# Altium PCB ffultra_pcb.PcbDoc (part 3 of 3)
Units mm, origin at the board's own origin, x right, y up, seen from the top; angles counter-clockwise.
Board outline 28 x 55 mm, 6 copper layers (Top, GND-T, Inner, Power, GND-B, Bottom), stack 1.538 mm thick; 121 components, 88 nets, 471 pads, 349 vias.
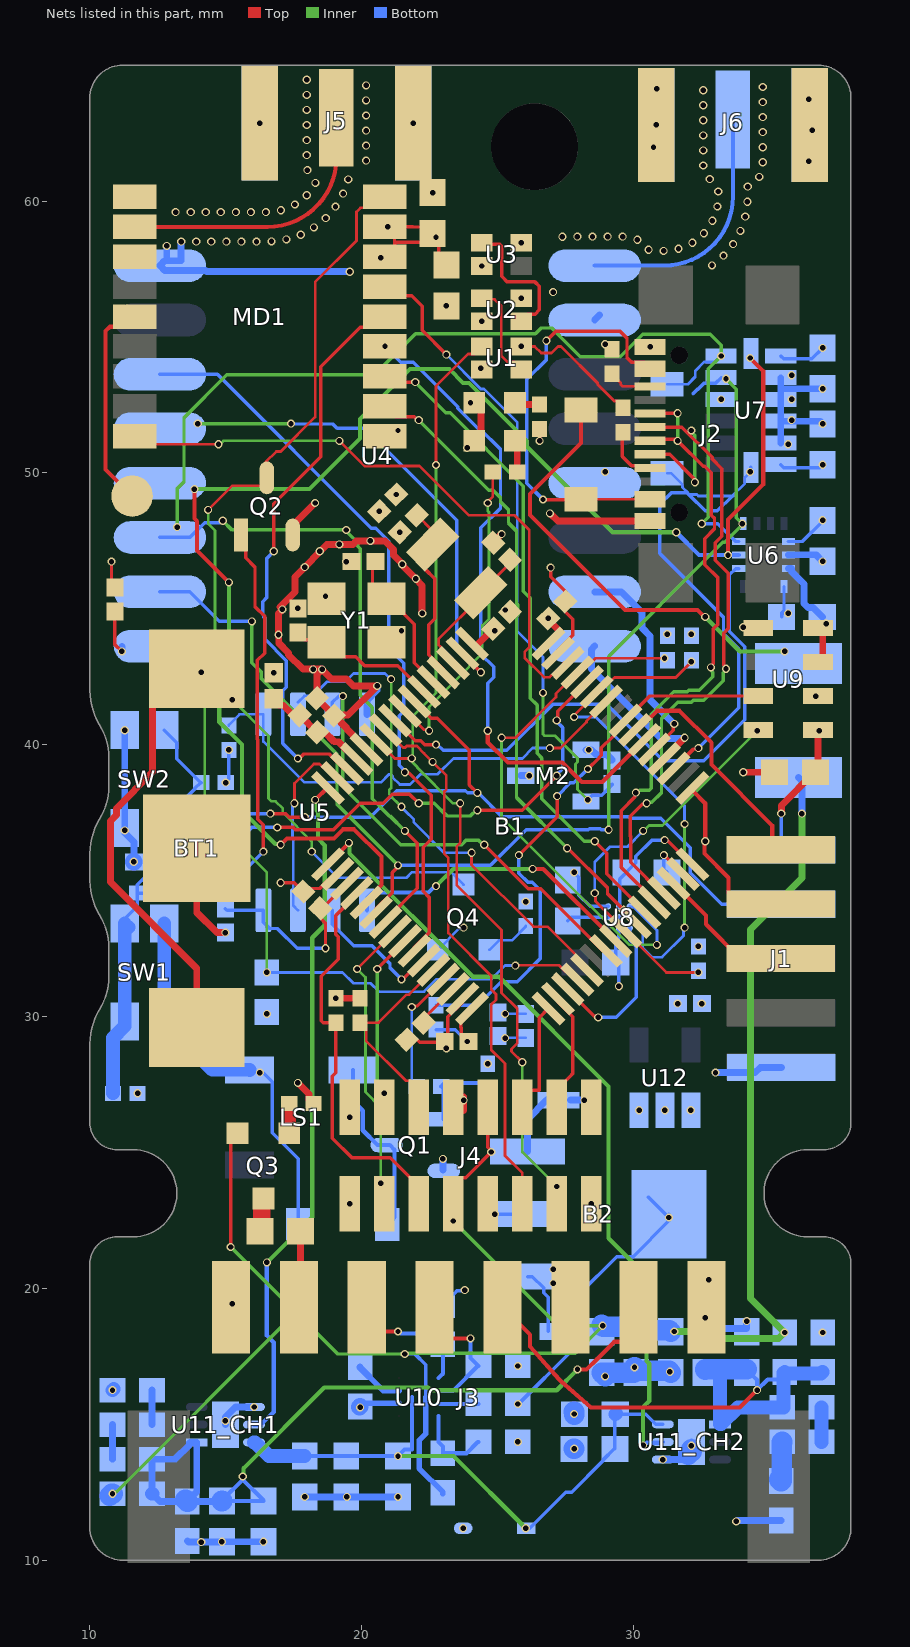
[diagram p6: the nets of this part, all layers, seen from the top]

## Via types
v1: diameter 0.3, hole 0.2, Top to Bottom, tented both sides, 349 vias

## Nets (pads, with @x,y where several pads share a name; then routed paths per layer and width w, separated by ;. In a path a pad name is that pad's centre, name@x,y a point inside that pad or via, vN(x,y) a via of type N, cw(c..) or ccw(c..) an arc to the next point about the centre after c; other vN are vias at no path point) (continued)
3V3: B1.1 B1.19 B1.32 B1.48 B1.64 B2.2 B2.4 C9.2 C10.2 C11.2 C12.2 C13.2 C14.2 C15.2 C16.2 C17.2 C18.2 C19.2 C21.2 C22.2 C23.2 C25.2 C27.2 C28.2 C29.2 C39.1 D1.2 FB1.2 J1.10 J4.7 J4.10 LS1.1 M2.3 MD1.7 MD1.8 Q4.2 R1.2 R5.2 R10.1 R12.2 R14.2 R15.2 R16.2 R17.2 R18.2 R19.2 R24.2 SW1.1 SW1.1' U1.2 U2.2 U3.2 U4.13 U5.8 U6.5 U6.8 U7.1 U7.6 U8.B3 U9.1 U9.2 U12.1 U12.3 | length 67.9
  Top w0.1: v1(10.795,46.736) 10.795,45.906 C39.1@10.922,45.779 C39.1@11.108,45.593
  Top w0.127: v1(18.669,32.512) 18.669,33.433 18.472,33.63 C14.2@18.472,33.979 18.546,33.979 B1.19@19.465,34.898 ; v1(20.701,57.912) 20.815,57.912 MD1.7@20.856,57.953 21.206,58.303 21.206,58.417 ; MD1.8@20.856,59.053 MD1.8@21.206,59.053 ; C15.2@23.114,57.646 22.829,57.93 22.829,58.59 C16.2@22.606,58.813 C16.2@22.543,58.75 ; C10.2@23.935,29.083 23.915,29.083 23.668,29.329 23.668,29.583 23.645,29.607 23.645,29.886 B1.32@24.061,30.301 ; v1(26.543,51.181) R14.2@26.543,51.62 ; v1(31.144,36.494) 31.178,36.461 31.256,36.461 32.112,35.605 B1.48@32.176,35.605 ; U9.1@36.691,40.447 U9.1@36.787,40.543 ; 21.206,58.417 MD1.8@21.206,59.053 ; 21.206,58.417 21.28,58.491 22.284,58.491 C16.2@22.543,58.75 ; MD1.8@21.206,59.053 21.883,59.053 21.888,59.048 22.244,59.048 C16.2@22.543,58.75
  Top w0.254: v1(19.05,30.676) R5.2@19.939,30.676 ; 23.749,26.543 v1(23.749,26.924) v1@23.749,27.051 ; B1.1@24.061,43.719 24.158,43.622 24.191,43.622 C13.2@24.835,44.266 ; C9.2@26.714,44.647 v1(26.867,44.647) ; C9.2@26.808,44.647 27.288,44.167 27.288,44.135 B1.64@26.872,43.719 B1.64@26.872,43.752 ; v1(35.433,37.465) 35.442,37.474 35.442,37.765 36.666,38.989 C29.2@36.691,38.989 36.787,39.085 U9.1@36.787,40.543
  Bottom w0.1: Q4.2@22.799,32.455 23.58,33.236 23.711,33.236 v1(23.749,33.274) ; v1(25.273,29.21) 25.273,29.213 25.279,29.219 C11.2@26.035,29.219
  Bottom w0.127: C21.2@14.986,33.968 15.045,33.909 U5.8@16.383,33.909 16.383,33.466 16.609,33.24 16.897,33.24 17.625,32.512 v1(18.669,32.512) ; v1(14.997,38.608) 15.113,38.724 v1(15.113,39.809) ; v1(16.256,27.94) 16.379,27.94 16.717,27.602 16.717,25.725 17.666,24.776 D1.2@17.666,22.352 ; R17.2@22.733,29.522 23.437,29.522 v1(23.876,29.083) ; v1(24.892,22.733) B2.2@26.102,22.733 ; v1(25.744,15.748) 25.769,15.748 27.745,17.724 C19.2@27.745,18.415 27.765,18.415 28.012,18.661 28.012,19.804 29.379,21.171 29.99,21.171 31.302,22.483 v1(31.302,22.608) ; U8.B3@29.464,34.055 29.483,34.074 29.483,34.146 29.486,34.149 29.486,35.062 30.081,35.657 30.081,35.897 30.678,36.494 v1(31.144,36.494) ; B2.4@30.549,23.361 v1(31.302,22.608) ; B2.4@31.302,22.733 v1(31.302,22.608) ; U7.6@35.418,50.303 35.524,50.197 36.85,50.197 v1(36.957,50.304) ; U7.1@35.418,54.303 35.524,54.197 36.556,54.197 v1(36.957,54.598) ; v1(35.433,37.465) 35.433,36.135 J1.10@35.437,36.131 ; C23.2@35.445,44.704 C23.2@35.445,44.843 ; U6.8@35.536,45.822 35.536,44.934 C23.2@35.445,44.843 ; v1(35.687,44.831) 35.675,44.843 C23.2@35.445,44.843 ; U6.5@35.7,47.477 36.211,47.477 36.957,48.223 C22.2@36.957,48.248
  Bottom w0.254: M2.3@25.851,38.862 v1(26.162,38.862)
  Bottom w0.508: SW1.1'@12.734,33.423 SW1.1@12.734,29.823 12.734,29.648 13.005,29.377 13.18,29.377 14.516,28.041 15.878,28.041 LS1.1@15.88,28.039
  other v1: 30.206,26.556 32.106,26.556 16.51,30.099 32.512,30.48 32.385,32.581 36.83,40.513 36.703,41.783 16.764,42.643 31.242,44.069 32.131,44.069 24.892,44.196 36.957,48.26 21.266,49.206 28.956,50.038 24.384,53.848 24.421,55.582 24.421,57.614 22.733,58.674 20.955,59.055
BAT+: J3.2 RT1.1 | length 2.8
  Top w0.254: J3.2@17.686,19.304 17.746,19.364 RT1.1@17.746,22.098
BOOT0: B1.60 R2.2 R7.2 SW1.2 SW1.2' | length 30.7
  Top w0.127: v1(16.891,36.957) 17.476,36.957 17.562,36.871 18.964,36.871 19.939,37.846 20.788,37.846 21.128,38.186 21.758,38.186 v1(22.098,37.846) ; v1(24.257,37.592) 24.304,37.592 25.908,37.592 v1(27.178,38.862) ; v1(27.178,40.894) 27.211,40.927 27.211,41.23 B1.60@28.287,42.305
  Inner w0.127: v1(22.098,37.846) 22.67,37.846 23.137,37.379 23.997,37.379 24.21,37.592 v1(24.257,37.592)
  Bottom w0.127: SW1.2'@11.284,33.423 11.284,33.598 11.746,34.06 R7.2@11.746,34.544 ; R7.2@12.003,34.544 R7.2@11.746,34.544 ; v1(16.891,36.957) 15.946,36.957 14.103,35.114 12.01,35.114 11.746,34.849 R7.2@11.746,34.544 ; v1(27.178,38.862) 27.178,38.909 27.391,39.122 27.391,40.634 27.178,40.847 v1(27.178,40.894)
  Bottom w0.508: R2.2@10.853,27.178 10.853,29.217 11.284,29.648 SW1.2'@11.284,32.852 ; SW1.2'@11.284,33.423 SW1.2'@11.284,32.852 ; SW1.2'@11.429,33.287 11.284,33.142 SW1.2'@11.284,32.852
BUZZ: B1.29 R3.1 | length 4.6
  Top w0.1: v1(21.844,30.353) 21.882,30.391 22.044,30.391 23,31.348 B1.29@23,31.362
  Bottom w0.1: v1(21.844,30.353) 21.844,27.617 R3.1@22.029,27.432
CONT1: R35_CH1.1 R37_CH1.2 | length 1.3
  Bottom w0.254: R35_CH1.1@10.832,13.716 R37_CH1.2@10.832,14.986
CONT2: R35_CH2.1 R37_CH2.2 | length 1.3
  Bottom w0.508: R37_CH2.2@36.92,14.351 R35_CH2.1@36.92,15.621
DEBUG_LED: B1.8 R6.2 | length 11.7
  Top w0.1: B1.8@21.586,41.245 21.603,41.245 22.297,40.551 22.441,40.551 v1(22.479,40.513) ; v1(24.638,48.895) 24.638,48.949 24.823,49.134 R6.2@24.823,50.038
  Inner w0.1: v1(22.479,40.513) 22.479,41.346 22.479,41.387 23.14,42.048 23.413,42.321 23.431,42.339 23.449,42.365 24.438,43.377 24.438,44.384 24.68,44.626 24.68,48.557 24.642,48.595 24.642,48.891 v1(24.638,48.895)
EN_CH1: B1.16 U11_CH1.5 | length 25.2
  Top w0.154: v1(18.288,37.973) 18.731,38.416 B1.16@18.758,38.416
  Inner w0.154: v1(16.51,20.955) 18.182,22.627 18.182,32.901 18.642,33.361 18.642,36.296 18.388,36.55 18.388,37.537 18.316,37.61 18.316,37.945 v1(18.288,37.973)
  Bottom w0.154: U11_CH1.5@16.039,14.986 16.296,14.986 16.764,15.454 16.764,18.013 16.51,18.267 v1(16.51,20.955)
EN_CH2: B1.17 U11_CH2.5 | length 29.3
  Top w0.154: B1.17@18.758,35.605 18.758,35.619 v1(19.526,36.388)
  Inner w0.154: v1(19.526,36.388) 19.548,36.366 19.548,36.006 24.088,31.466 25.049,31.466 29.083,27.432 29.083,21.844 30.48,20.447 30.48,17.329 30.58,17.229 30.58,15.86 30.353,15.633 v1(30.353,14.224)
  Bottom w0.154: v1(30.353,14.224) 30.392,14.224 30.493,14.325 31.052,14.325 U11_CH2.5@31.078,14.351
"Flash CLK": B1.27 U5.6 | length 5.1
  Top w0.127: v1(21.463,31.369) 21.51,31.369 22.21,32.069 B1.27@22.293,32.069
  Bottom w0.127: U5.6@18.923,33.909 18.923,33.394 19.712,32.605 20.38,32.605 21.041,31.944 21.041,31.791 v1(21.463,31.369)
"Flash IO 0": B1.40 U5.5 | length 11.1
  Top w0.154: v1(26.289,35.433) 26.68,35.433 29.337,32.776 B1.40@29.347,32.776
  Inner w0.154: v1(22.733,34.798) 23.368,35.433 v1(26.289,35.433)
  Bottom w0.154: U5.5@20.193,33.909 20.193,34.352 20.406,34.564 22.46,34.564 22.694,34.798 v1(22.733,34.798)
"Flash IO 1": B1.37 U5.2 | length 18.6
  Top w0.1: v1(24.042,36.027) 24.042,35.583 26.316,33.309 26.835,33.309 28.287,31.857 B1.37@28.287,31.716
  Inner w0.1: v1(21.082,42.418) 21.082,38.408 21.011,38.338 21.011,38.171 v1(21.463,37.719)
  Bottom w0.1: U5.2@17.653,41.563 17.891,41.801 18.199,41.801 18.717,42.319 19.407,42.319 19.706,42.618 20.858,42.618 21.058,42.418 v1(21.082,42.418) ; v1(21.463,37.719) 21.463,37.697 21.622,37.538 21.917,37.243 21.917,37.145 23.035,36.027 v1(24.042,36.027)
"Flash IO 2": B1.39 U5.3 | length 16.6
  Top w0.127: v1(24.511,36.322) 26.134,34.699 26.595,34.699 28.871,32.423 B1.39@28.994,32.423
  Inner w0.127: v1(19.309,41.788) 19.309,38.45 21.437,36.322 23.675,36.322 23.848,36.495 24.291,36.495 24.464,36.322 v1(24.511,36.322)
  Bottom w0.127: U5.3@18.923,41.119 18.923,41.562 19.149,41.788 v1(19.309,41.788)
"Flash IO 3": B1.15 U5.7 | length 6.8
  Top w0.1: v1(17.526,37.846) 17.526,38.581 18.239,39.294 18.446,39.294 18.554,39.185 B1.15@19.111,38.77
  Bottom w0.1: v1(17.526,37.846) 17.526,37.792 17.453,37.719 17.453,36.529 17.485,36.497 17.485,34.077 U5.7@17.653,33.909
"Flash NCS": B1.58 R15.1 U5.1 | length 17.3
  Top w0.1: v1(26.924,39.878) 27.312,39.878 28.267,40.833 28.267,40.871 B1.58@28.994,41.598
  Bottom w0.1: R15.1@15.113,40.709 15.113,40.734 15.498,41.119 U5.1@16.383,41.119 16.383,40.122 17.888,38.617 20.703,38.617 20.995,38.909 21.077,38.909 21.136,38.85 21.136,38.801 21.402,38.535 21.778,38.535 22.159,38.916 22.794,38.916 23.375,39.497 25.908,39.497 26.289,39.878 v1(26.924,39.878)
GND: B1.12 B1.18 B1.31 B1.47 B1.63 B2.1 BT1.1 C1.1 C2.1 C3.1 C4.1 C5.1 C6.1 C7.1 C8.1 C9.1 C10.1 C11.1 C12.1 C13.1 C14.1 C15.1 C16.1 C17.1 C18.1 C19.1 C20.1 C21.1 C22.1 C23.1 C24.1 C25.1 C26.1 C27.1 C28.1 C29.1 C30.1 C31.1 C32.1 C33.1 C34_CH1.1 C34_CH2.1 C35_CH1.1 C35_CH2.1 C36_CH1.1 C36_CH2.1 C37_CH1.1 C37_CH2.1 C38.2 C39.2 D3.1 D4.2 DS1.1 J1.6 J2.A1-B12 J2.B1-A12 J3.1 J3.6 J3.8 J4.1 J4.2 J4.15 J4.16 J5.2 J5.3 J5.4 J5.5 J6.2 J6.3 J6.4 J6.5 M2.1 MD1.1 MD1.10 MD1.12 Q1.2 Q2.2 R2.1 R4.1 R8.1 R9.1 R11.1 R13.1 R22.1 R23.1 R26.1 R30.1 R36_CH1.1 R36_CH2.1 R38_CH1.1 R38_CH2.1 SW2.2 SW2.2' U1.3 U2.3 U3.3 U4.1 U4.8 U4.10 U5.4 U6.6 U6.7 U7.2 U7.3 U7.4 U7.5 U7.11 U8.B1 U8.B2 U8.C3 U9.3 U9.4 U9.5 U10.8 U11_CH1.4 U11_CH1.7 U11_CH2.4 U11_CH2.7 U12.2 Y1.2 Y1.4 | length 112.2
  Top w0.1: v1(25.871,54.654) 26.365,54.654 26.609,54.41 26.985,54.41 27.229,54.654 27.33,54.654 28.685,53.299 28.685,53.248 29.29,52.643 29.391,52.643 29.591,52.443 R8.1@29.591,52.393
  Top w0.127: C39.2@10.922,44.899 10.922,43.688 v1(11.176,43.434) ; v1(17.018,34.925) 17.526,34.925 C14.1@17.85,34.601 17.96,34.712 18.464,34.712 19.004,35.251 B1.18@19.111,35.251 ; C3.1@21.66,29.153 21.674,29.167 22.023,29.167 22.131,29.059 23.031,29.059 C10.1@23.055,29.083 ; v1(23.114,28.829) 23.055,28.888 C10.1@23.055,29.083 ; B1.31@23.707,30.655 23.707,30.533 23.17,29.995 23.17,29.198 C10.1@23.055,29.083 ; v1(24.003,52.578) D3.1@24.142,52.578 ; v1(26.951,46.519) 26.957,46.513 26.957,46.178 27.503,45.632 27.503,45.283 27.475,45.255 27.475,44.906 27.763,44.618 27.763,44.026 27.226,43.488 B1.63@27.226,43.366 ; v1(31.115,35.941) 31.124,35.941 31.814,35.251 B1.47@31.822,35.251 ; U9.3@36.787,43.043 U9.3@37.037,43.043
  Top w0.254: BT1.1@13.932,36.195 13.932,33.834 14.669,33.097 14.977,33.097 v1(14.986,33.088) ; v1@16.928,44.058 16.939,44.068 16.939,44.826 17.083,44.97 v1(17.083,44.982) ; v1(16.939,44.047) 16.948,44.038 16.948,43.74 17.307,43.38 17.307,43.311 17.836,42.782 18.204,42.782 v1(18.213,42.773) ; v1@17,45.065 17.549,45.613 17.549,46.177 v1(17.907,46.535) v1@18.473,47.101 ; Q2.2@17.46,47.718 17.46,48.061 18.288,48.889 v1(18.288,48.895) ; C8.1@17.47,44.831 C8.1@17.653,45.014 ; v1(17.653,27.559) 18.057,27.155 18.057,26.945 18.205,26.797 R13.1@18.23,26.797 ; v1@18.252,42.811 18.281,42.782 18.533,42.782 v1(18.542,42.773) ; v1(18.457,47.117) 18.47,47.117 18.715,47.362 19.168,47.362 v1(19.177,47.371) 19.673,47.371 19.791,47.489 20.311,47.489 v1(20.32,47.498) 20.325,47.493 20.851,47.493 21.163,47.181 21.163,46.982 21.493,46.652 v1(21.493,46.639) ; v1(19.431,46.736) C7.1@19.626,46.736 ; B1.12@20.172,39.83 20.172,39.863 19.469,40.566 19.469,40.59 C2.1@18.98,41.078 ; MD1.1@20.856,51.353 21.065,51.562 v1(21.336,51.562) ; v1@21.502,46.633 21.502,46.598 v1(21.995,46.105) ; v1@21.991,46.097 22.225,45.863 v1(22.225,44.831) ; DS1.1@24.142,51.181 24.396,51.435 24.396,52.324 D3.1@24.142,52.578 ; C5.1@24.835,47.428 24.835,47.434 25.146,47.746 v1(25.146,47.752) ; v1(26.924,48.514) 26.936,48.514 27.215,48.235 J2.A1-B12@30.61,48.235 ; v1(34.036,38.989) C29.1@35.191,38.989 ; U9.3@36.787,43.043 36.96,43.216 36.96,44.326 v1(37.084,44.45) ; v1(18.542,42.773) 18.897,42.418 19.443,42.418 19.697,42.164 v1(20.574,42.164) 19.502,41.092 18.994,41.092 C2.1@18.98,41.078 ; v1(18.542,42.773) 18.542,42.761 18.359,42.578 18.359,41.727 C1.1@18.345,41.713 C2.1@18.98,41.078
  Top w0.635: J3.8@32.686,19.304 32.686,20.304 32.702,20.32 v1(32.766,20.32) ; J6.5@36.576,62.324 J6.5@36.607,62.355
  Bottom w0.1: Q1.2@22.987,24.357 Q1.2@23.021,24.323 ; v1(25.273,30.099) C11.1@26.035,30.099
  Bottom w0.127: R22.1@22.987,19.394 22.987,19.419 23.374,19.806 23.399,19.806 23.499,19.906 23.757,19.906 v1(23.79,19.939) ; B2.1@26.102,20.433 26.282,20.433 26.693,20.021 26.693,19.842 26.865,19.67 C19.1@26.865,18.415 ; v1(27.813,35.306) 27.989,35.13 27.989,34.468 28.403,34.055 U8.C3@29.064,34.055 ; v1(29.464,31.115) 29.464,31.985 C24.1@29.344,31.985 29.344,32.752 29.464,32.872 U8.B1@29.464,33.255 U8.B2@29.464,33.655 ; v1(31.115,35.941) 31.115,35.421 C25.1@31.23,35.306
  Bottom w0.203: R26.1@19.939,15.658 20.058,15.777 U10.8@21.377,15.777
  Bottom w0.254: v1(11.176,43.434) 11.185,43.443 U4.1@11.185,43.617 ; v1(11.284,40.535) SW2.2@11.284,36.935 11.284,36.76 11.625,36.419 11.625,35.692 C4.1@11.62,35.687 ; U4.8@12.828,57.807 v1(12.828,58.35) ; v1(13.359,58.511) 13.359,57.807 12.754,57.807 U4.8@12.573,57.626 12.754,57.445 14.254,57.445 14.295,57.404 v1(19.558,57.404) ; R36_CH1.1@13.589,10.705 13.626,10.668 14.847,10.668 v1(14.859,10.68) v1(16.383,10.68) ; U11_CH1.7@14.986,14.986 14.986,15.263 15.359,15.636 v1(16.039,15.636) ; v1(17.907,12.331) C35_CH1.1@19.431,12.331 ; v1(19.456,12.331) v1(21.336,12.331) ; U5.4@20.193,41.119 20.193,41.634 20.565,42.006 20.565,42.155 v1(20.574,42.164) ; Q1.2@22.987,24.357 v1(22.987,24.765) ; C20.1@27.686,26.924 v1(28.194,26.924) ; v1(27.813,15.379) C35_CH2.1@27.825,15.367 ; M2.1@28.251,39.812 28.451,39.812 28.631,39.632 29.027,39.632 29.21,39.449 C38.2@29.21,39.429 ; U4.10@28.573,55.626 U4.10@28.754,55.807 ; v1(31.078,13.701) 31.758,13.701 32.131,14.074 U11_CH2.7@32.131,14.351 ; C36_CH2.1@32.639,18.518 34.151,18.518 34.151,18.784 v1(34.163,18.796) ; v1(33.016,27.94) 34.472,27.94 34.663,28.131 J1.6@35.437,28.131 ; v1(33.782,11.43) 33.794,11.43 33.831,11.467 R38_CH2.1@35.433,11.467 ; U7.5@35.418,51.103 U7.4@35.418,51.903 ; U7.2@35.418,53.503 35.418,53.103 ; U6.7@35.7,46.477 35.815,46.477 35.815,46.374 36.272,45.916 36.272,45.201 36.421,45.052 36.597,45.052 C23.1@36.945,44.704 ; U6.6@35.7,46.977 35.7,46.99 36.715,46.99 v1(36.957,46.748) ; v1(36.957,51.804) 36.858,51.903 U7.4@35.418,51.903 ; v1(36.957,53.098) 35.423,53.098 35.418,53.103 ; U7.4@35.418,51.903 U7.3@35.418,52.703 35.418,53.103
  Bottom w0.508: v1(10.832,16.256) R38_CH1.1@10.877,16.301
  Bottom w0.635: v1(11.612,35.695) 11.62,35.687 C4.1@11.625,35.687 ; v1(16.245,62.865) J5.5@16.245,63.56 ; R26.1@19.921,15.64 R26.1@19.939,15.658
  Bottom w0.76: C34_CH2.1@27.813,14.097 v1(27.819,14.103) ; C35_CH2.1@27.813,15.462 27.825,15.45 C35_CH2.1@27.825,15.367 C35_CH2.1@27.819,15.361 ; v1(28.956,16.764) 28.829,16.891 C30.1@28.829,16.903 30.004,16.903 C31.1@30.035,16.934 ; v1(30.035,17.093) 30.162,16.966 31.305,16.966 C32.1@31.369,16.903 ; U11_CH2.7@32.011,13.881 32.131,14.001 U11_CH2.7@32.131,14.074
  other v1: 14.097,10.668 23.732,11.176 32.131,14.213 25.744,14.351 14.986,15.125 19.939,15.621 31.337,16.935 25.744,17.145 36.957,18.378 32.639,18.923 15.24,19.431 27.051,20.193 27.051,20.701 19.555,23.117 28.445,23.117 19.558,26.289 31.156,26.556 11.753,27.178 24.638,28.263 31.623,30.48 26.035,34.232 11.284,36.848 28.351,39.812 21.463,44.196 34.036,44.323 25.273,44.958 17.653,45.017 18.669,45.466 21.406,47.822 20.644,48.584 23.876,50.927 35.687,51.054 35.814,51.943 33.223,52.703 35.814,52.705 35.814,53.594 30.61,54.635 28.956,54.737 23.114,56.146 25.871,56.432 27.042,56.655 32.887,57.638 33.309,57.996 31.107,58.168 30.554,58.213 31.655,58.248 33.664,58.421 25.871,58.464 32.164,58.467 13.913,58.511 14.467,58.511 15.021,58.511 15.575,58.511 16.129,58.511 16.683,58.517 30.141,58.581 17.232,58.591 27.383,58.688 27.937,58.697 28.491,58.697 29.045,58.697 29.599,58.697 17.759,58.762 32.59,58.82 33.933,58.906 18.243,59.031 32.902,59.278 18.677,59.376 34.11,59.43 13.154,59.595 13.708,59.595 14.262,59.595 14.816,59.595 15.37,59.595 15.924,59.595 16.478,59.595 17.028,59.663 19.036,59.798 33.084,59.801 17.54,59.875 34.191,59.978 17.976,60.216 19.314,60.276 22.606,60.313 33.117,60.354 34.201,60.532 18.294,60.67 19.503,60.797 32.803,60.811 34.625,60.89 18.001,61.14 32.565,61.311 34.753,61.429 36.449,61.468 20.164,61.489 17.976,61.693 32.565,61.865 30.734,61.976 34.753,61.983 20.164,62.043 17.976,62.247 32.565,62.419 34.753,62.537 20.164,62.597 36.576,62.611 17.976,62.801 30.834,62.805 21.895,62.865 32.565,62.973 34.753,63.091 20.164,63.151 17.976,63.355 32.565,63.527 34.753,63.645 20.164,63.705 36.449,63.754 17.976,63.909 32.565,64.081 30.861,64.135 34.753,64.199 20.164,64.259 17.976,64.463
GPS_ANT: J5.1 MD1.11 | length 11.5
  Top w0.154: MD1.11@11.656,59.053 16.53,59.053 ccw(c16.53,61.593) 19.07,61.593 J5.1@19.07,63.065 ; J5.1@18.94,62.392 J5.1@18.94,63.565
GPS_NRST: B1.36 MD1.9 Q2.3 R10.2 | length 45.8
  Top w0.1: v1(14.351,48.641) 15.242,49.532 16.31,49.532 16.51,49.732 Q2.3@16.51,49.818 16.466,49.863 16.466,50.4 16.858,50.793 17.021,50.793 18.29,52.061 18.29,57.025 19.806,58.541 19.806,59.607 19.952,59.753 20.456,59.753 MD1.9@20.856,60.153 ; v1(25.654,31.877) 25.663,31.886 27.268,31.886 27.792,31.362 B1.36@27.933,31.362
  Inner w0.1: v1(14.351,48.641) 14.351,48.137 14.605,47.883 14.605,42.006 14.544,41.944 14.544,41.84 14.224,41.52 14.224,37.585 16.51,35.299 v1(16.51,31.623)
  Bottom w0.1: v1(16.51,31.623) 19.297,31.623 19.694,31.226 20.318,31.226 20.629,30.915 22.297,30.915 22.759,31.377 24.774,31.377 25.275,31.877 v1(25.654,31.877)
GPS_PPS: B1.54 MD1.4 | length 24.2
  Top w0.154: v1(24.638,40.513) 24.638,40.087 25.381,39.343 27.377,39.343 28.094,38.627 28.851,38.627 B1.54@30.408,40.184
  Bottom w0.127: v1(20.856,54.653) 21.432,54.077 21.895,54.077 23.536,52.437 23.536,52.384 24.294,51.625 24.347,51.625 25.105,50.867 25.105,48.701 24.384,47.98 24.384,43.333 24.854,42.863 24.854,42.476 24.638,42.26 v1(24.638,40.513)
GPS_PRG: B1.62 MD1.18 | length 22.9
  Top w0.1: MD1.18@11.656,51.353 11.955,51.054 v1(14.732,51.054) ; v1(19.177,51.181) 20.104,50.254 22.129,50.254 23.942,48.441 25.63,48.441 26.16,47.911 26.16,43.572 25.995,43.408 25.995,43.2 26.707,42.488 26.914,42.488 26.981,42.555 27.438,43.012 B1.62@27.579,43.012
  Inner w0.1: v1(14.732,51.054) 14.786,51.054 14.913,51.181 v1(19.177,51.181)
GPS_RX: B1.43 MD1.3 | length 24.5
  Top w0.127: MD1.3@20.856,53.553 21.069,53.34 v1(21.971,53.34) ; v1(28.575,36.449) 29.015,36.009 29.015,35.247 30.408,33.854 B1.43@30.408,33.837
  Inner w0.127: v1(21.971,53.34) 23.097,52.214 23.25,52.214 25.949,49.516 25.949,45.653 26.203,45.399 26.203,41.716 26.457,41.462 26.457,39.684 26.629,39.511 26.629,38.014 28.194,36.449 v1(28.575,36.449)
GPS_TX: B1.42 MD1.2 | length 23.4
  Top w0.127: MD1.2@20.856,52.453 21.242,52.067 21.928,52.067 22.051,51.943 v1(22.098,51.943) ; v1(27.559,36.195) 27.585,36.195 29.042,34.738 29.042,34.512 29.999,33.555 30.054,33.501 B1.42@30.054,33.483
  Inner w0.127: v1(22.098,51.943) 24.679,49.362 24.832,49.362 25.105,49.089 25.105,48.936 25.4,48.641 25.4,48.159 25.695,47.865 25.695,45.198 25.74,45.152 25.74,44.764 25.695,44.718 25.695,38.059 v1(27.559,36.195)
GPS_VBACKUP: C38.1 M2.2 MD1.6 | length 23.9
  Top w0.127: MD1.6@20.856,56.853 21.194,56.515 21.844,56.515 22.225,56.134 22.225,55.245 v1(23.114,54.356)
  Inner w0.1: v1(26.67,41.91) 26.67,40.391 26.729,40.332 27.112,40.332 27.94,39.504 27.94,39.369 27.867,39.296 27.867,38.92 27.94,38.847 27.94,38.354 v1(28.321,37.973)
  Bottom w0.1: v1(23.114,54.356) 24.38,53.09 24.5,53.09 25.727,51.863 25.727,44.17 26.67,43.227 v1(26.67,41.91)
  Bottom w0.127: M2.2@28.251,37.912 28.487,38.149 28.83,38.149 29.21,38.529 C38.1@29.21,38.549
GPS_WAKE: B1.14 MD1.5 | length 21.2
  Top w0.127: v1(16.764,47.117) 16.764,48.86 18.493,50.589 18.493,53.913 19.947,55.367 20.47,55.367 MD1.5@20.856,55.753 ; v1(17.652,39.496) 17.698,39.496 17.864,39.661 18.805,39.661 19.342,39.123 B1.14@19.465,39.123
  Bottom w0.127: v1(16.764,47.117) 16.515,46.868 16.515,45.423 16.359,45.267 16.359,44.8 16.399,44.761 16.399,44.699 16.426,44.671 16.426,43.899 17.231,43.094 17.231,42.123 17.1,41.991 17.1,40.048 v1(17.652,39.496)
HRLP_C\S\: B1.51 D2.1 U7.7 | length 19.4
  Top w0.127: B1.51@31.477,39.115 32.208,39.845 32.352,39.845 v1(32.385,39.878)
  Bottom w0.1: D2.1@31.238,49.987 31.39,49.987 31.797,49.58 31.797,49.528 31.804,49.521 31.804,49.469 31.996,49.277 ; 32.07,49.203 32.331,49.203 32.385,49.149 33.629,49.149 ; 33.7,49.149 33.629,49.149 ; U7.7@34.32,50.057 34.095,49.832 34.095,49.615 33.629,49.149
  Bottom w0.127: v1(32.385,39.878) 33.868,41.361 33.868,43.522 33.311,44.08 33.311,44.693 30.966,47.038 30.966,48.843 31.387,49.264 31.983,49.264 32.057,49.19 32.642,48.604 33.084,48.604 33.629,49.149 ; U7.7@34.32,50.057 U7.7@34.32,50.206
  other v1: 34.29,50.038
I2C1_SCL: B1.61 R18.1 U8.A3 | length 19.8
  Top w0.1: v1(25.146,40.259) 25.661,40.259 27.152,41.75 27.152,41.881 27.93,42.659 28.074,42.659 28.598,43.183 31.136,43.183 v1(31.139,43.18)
  Inner w0.1: v1(25.146,40.259) 25.146,37.331 28.387,34.09 28.394,34.09 29.845,32.639 v1(30.861,32.639)
  Bottom w0.1: U8.A3@29.864,34.055 29.889,34.03 30.004,34.03 30.861,33.173 v1(30.861,32.639)
I2C1_SDA: B1.59 R19.1 U8.A2 | length 18.8
  Top w0.1: v1(27.813,41.021) 27.813,41.073 28.64,41.9 B1.59@28.64,41.952 28.782,41.952 29.306,42.476 31.554,42.476 v1(32.131,43.053)
  Inner w0.1: v1(31.877,33.274) v1(31.877,37.084)
  Bottom w0.1: v1(27.813,41.021) 28.612,41.021 31.877,37.756 v1(31.877,37.084) ; U8.A2@29.864,33.655 29.889,33.63 30.004,33.63 30.338,33.296 30.338,32.52 30.673,32.185 31.049,32.185 31.839,32.975 31.839,33.236 v1(31.877,33.274)
I2C3_SCL: B1.41 R16.1 U9.8 | length 14.4
  Top w0.1: v1(28.575,34.544) 28.604,34.515 28.604,34.244 29.701,33.147 B1.41@29.701,33.13 31.208,31.623 v1(32.385,31.623) ; v1(34.544,40.513) 34.574,40.543 U9.8@34.587,40.543
  Inner w0.1: v1(30.353,36.83) 30.377,36.83 30.577,37.03 31.061,37.03 v1(34.544,40.513)
  Bottom w0.1: v1(28.575,34.544) 28.575,35.696 29.128,36.249 29.772,36.249 v1(30.353,36.83) ; v1(32.385,31.623) R16.1@32.385,31.681
I2C3_SDA: B1.56 R17.1 U9.7 | length 20.7
  Top w0.127: v1(25.781,35.941) 27.191,37.351 v1(27.191,38.113) ; v1(28.321,39.108) 28.736,39.523 28.736,39.536 28.819,39.618 28.819,39.886 29.233,40.301 29.701,40.769 B1.56@29.701,40.891 30.603,41.793 U9.7@34.587,41.793
  Bottom w0.127: R17.1@22.733,30.422 24.27,30.422 25.127,31.279 25.717,31.279 26.574,32.135 26.574,34.641 26.271,34.944 26.117,34.944 25.781,35.28 v1(25.781,35.941) ; v1(27.191,38.113) 27.679,38.601 27.806,38.601 28.313,39.108 v1(28.321,39.108)
LRHP_NSS: B1.9 U6.12 | length 21.5
  Top w0.127: B1.9@21.232,40.891 21.969,40.154 22.176,40.154 22.326,40.005 v1(22.733,40.005)
  Bottom w0.127: v1(22.733,40.005) 22.78,40.005 22.993,39.792 25.34,39.792 27.037,41.488 29.01,41.488 31.088,39.411 32.579,39.411 34.085,40.917 34.085,43.612 33.528,44.17 33.528,46.248 33.757,46.477 U6.12@33.872,46.477
MAG_INT: B1.35 U8.A1 | length 5.9
  Top w0.127: B1.35@27.579,31.008 27.579,30.988 28.562,30.005 28.669,30.005 v1(28.702,29.972)
  Bottom w0.127: v1(28.702,29.972) 29.363,29.972 30.108,30.716 30.108,32.569 29.864,32.813 U8.A1@29.864,33.255
MPU_HSE_IN: B1.5 C7.2 Y1.1 | length 5.5
  Top w0.127: C7.2@20.506,46.736 20.398,46.628 20.398,45.891 Y1.1@20.912,45.377 21.012,45.377 21.548,44.84 21.548,44.813 21.93,44.431 21.93,43.021 B1.5@22.647,42.305
MPU_HSE_OUT: B1.6 C8.2 Y1.3 | length 5.6
  Top w0.127: C8.2@17.653,44.137 17.653,44.117 17.899,43.87 18.711,43.87 19.341,43.24 19.776,43.24 20.103,42.914 21.331,42.914 22.261,41.984 B1.6@22.261,41.952
  Top w0.254: B1.6@22.261,41.952 B1.6@22.293,41.952
MPU_LSE_IN: B1.3 C5.2 Y2.1 | length 5.1
  Top w0.1: B1.3@23.354,43.012 23.354,43.154 22.897,43.611 22.83,43.678 22.83,43.885 24.379,45.434 Y2.1@24.379,45.598 25.457,46.676 C5.2@25.457,46.806
MPU_LSE_OUT: B1.4 C6.2 Y2.2 | length 6.6
  Top w0.1: C6.2@22.028,48.444 22.034,48.45 22.611,47.874 Y2.2@22.611,47.366
  Top w0.127: Y2.2@22.611,47.366 22.328,47.083 22.328,46.466 22.692,46.102 22.692,44.637 22.463,44.408 22.463,43.319 23,42.781 B1.4@23,42.659
MPU_NRST: B1.7 C4.2 J1.9 R1.1 SW2.1 SW2.1' | length 35.7
  Top w0.127: v1(16.643,37.465) 17.211,37.465 17.338,37.338 v1(17.907,37.338) ; B1.7@21.94,41.598 22.557,40.98 22.774,40.98 23.963,39.791 23.963,38.521 v1(24.257,38.227)
  Bottom w0.127: C4.2@12.505,35.687 12.505,36.935 SW2.1@12.734,36.935 12.734,37.094 SW2.1@13.196,37.555 ; SW2.1'@12.734,40.535 13.196,40.073 13.196,39.485 R1.1@14.072,38.608 ; R1.1@14.097,38.608 R1.1@14.072,38.608 ; v1(16.643,37.465) 13.196,37.465 SW2.1@13.196,37.555 ; v1(17.907,37.338) 20.31,37.338 21.286,38.313 23.816,38.313 23.902,38.227 v1(24.257,38.227) 24.283,38.227 25.162,37.349 29.822,37.349 29.873,37.297 31.002,37.297 32.087,36.213 32.087,35.29 33.246,34.131 J1.9@35.437,34.131 ; SW2.1@13.196,37.555 13.196,37.707 13.861,38.372 13.861,38.396 R1.1@14.072,38.608
MPU_VCAP1: B1.30 C3.2 | length 1.7
  Top w0.1: C3.2@22.282,29.775 22.282,29.937 B1.30@23.354,31.008
NetBT1_2: BT1.2 Q4.3 | length 31.3
  Top w0.1: BT1.2@13.932,42.795 15.332,44.195 BT1.2@15.354,44.195 ; BT1.2@13.974,42.795 v1(14.097,42.672)
  Top w0.254: BT1.2@13.932,29.595 13.932,31.773 10.753,34.951 10.753,37.191 10.977,37.414 10.977,37.662 12.309,38.994 12.309,41.472 13.632,42.795 BT1.2@13.932,42.795
  Inner w0.1: v1(15.24,41.656) 16.573,40.322 16.573,38.029 16.684,37.919 16.831,37.919 17.097,37.653 17.097,37.506 18.161,36.442 v1(18.161,36.068)
  Bottom w0.1: v1(18.161,36.068) 19.123,35.106 21.639,35.106 21.839,35.306 23.298,35.306 Q4.3@23.749,34.855
NetC26_2: C26.2 U8.C2 | length 1.5
  Bottom w0.127: C26.2@27.578,33.521 27.712,33.655 U8.C2@29.064,33.655
NetC33_2: C33.2 C34_CH1.2 C34_CH2.2 C35_CH1.2 C35_CH2.2 D4.1 U10.6 U11_CH1.6 U11_CH2.6 | length 21.6
  Inner w0.152: v1(21.336,13.831) 23.38,13.831 v1(26.035,11.176)
  Bottom w0.127: D4.1@26.052,11.176 26.177,11.176 27.509,12.508 27.724,12.508 28.876,13.66 28.876,13.685 29.288,14.097 C34_CH2.2@29.313,14.097 29.313,15.355 C35_CH2.2@29.325,15.367 30.455,15.367 30.821,15.001 U11_CH2.6@31.078,15.001
  Bottom w0.152: C34_CH1.2@17.907,13.831 C35_CH1.2@19.431,13.831 v1(21.336,13.831) 21.573,14.068 21.852,14.068 U10.6@21.852,16.002
  Bottom w0.508: U11_CH1.6@16.039,14.336 16.08,14.336 16.585,13.831 C34_CH1.2@17.907,13.831 ; C35_CH2.2@29.325,15.367 C35_CH2.2@29.358,15.4
NetD1_1: D1.1 LS1.2 Q1.3 | length 6.7
  Bottom w0.154: LS1.2@19.68,28.039 19.68,26.897 20.039,26.537 20.039,25.818 20.584,25.273 21.034,25.273 21.209,25.098 21.209,22.619 D1.1@20.942,22.352
NetD3_2: D3.2 R14.1 | length 0.9
  Top w0.254: D3.2@25.642,52.578 25.7,52.52 R14.1@26.543,52.52
NetD5_2: D5.2 F1.1 | length 16.1
  Top w0.152: D5.2@28.067,52.311 28.067,51.098 26.19,49.221 26.19,48.457 29.688,44.959 32.358,44.959 32.613,44.704 v1(32.639,44.704)
  Inner w0.152: v1(32.639,44.704) 33.909,43.434 v1(35.56,43.434)
NetDS1_2: DS1.2 R6.1 | length 1.2
  Top w0.254: DS1.2@25.642,51.181 25.723,51.1 R6.1@25.723,50.038
NetJ2_A5: J2.A5 R8.2 | length 2.1
  Top w0.127: R8.2@29.591,51.493 29.591,50.606 29.926,50.271 30.524,50.271 J2.A5@30.61,50.185
NetJ2_B5: J2.B5 R9.2 | length 1.9
  Top w0.1: R9.2@29.21,53.63 29.21,53.627 29.53,53.307 29.53,53.256 29.601,53.185 J2.B5@30.61,53.185
  Top w0.127: R9.2@29.21,53.652 29.21,53.63 R9.2@29.422,53.419
NetMD1_14: MD1.14 TP1.1 | length 7.8
  Top w0.152: TP1.1@11.557,49.149 10.58,50.126 10.58,55.217 10.742,55.379 11.282,55.379 MD1.14@11.656,55.753
NetQ1_1: Q1.1 R3.2 R4.2 | length 3.4
  Bottom w0.154: Q1.1@23.021,26.223 23.021,27.34 R3.2@22.929,27.432 22.975,27.478 23.056,27.559 R4.2@24.442,27.559 ; R4.2@24.442,27.559 R4.2@24.638,27.363 R4.2@24.442,27.559
NetQ2_1: Q2.1 R7.1 | length 16.7
  Top w0.127: Q2.1@15.56,47.718 15.56,47.464 15.605,47.418 15.732,47.418 15.732,46.879 16.075,46.536 16.075,45.084 16.426,44.733 16.426,43.372 16.164,43.109 16.164,40.193 16.175,40.182 16.175,37.265 16.383,37.058 v1(16.383,36.068)
  Bottom w0.127: R7.1@12.646,34.544 14.549,34.544 14.567,34.562 14.877,34.562 v1(16.383,36.068)
NetQ3_1: Q3.1 R13.2 | length 1.1
  Top w0.508: R13.2@17.33,26.797 17.33,25.711 Q3.1@17.333,25.711
NetQ3_3: Q3.3 RT1.2 | length 1.3
  Top w0.635: RT1.2@16.256,22.098 16.319,22.162 16.319,23.247 Q3.3@16.383,23.311
NetQ4_1: Q4.1 R11.2 | length 1.7
  Bottom w0.1: Q4.1@24.699,32.455 25.049,32.805 25.533,32.805 26.035,33.307 R11.2@26.035,33.332
NetR26_2: R26.2 U10.9 | length 1.8
  Bottom w0.203: R26.2@20.262,16.76 20.795,16.227 U10.9@21.377,16.227
  Bottom w0.254: R26.2@19.939,17.108 19.939,17.083 R26.2@20.262,16.76
NetR37_CH1_1: R37_CH1.1 R38_CH1.2 | length 1.3
  Bottom w0.254: R37_CH1.1@12.282,14.986 R38_CH1.2@12.282,16.256
NetR37_CH2_1: R37_CH2.1 R38_CH2.2 | length 1.5
  Bottom w0.76: R38_CH2.2@35.363,12.972 35.418,12.917 R38_CH2.2@35.433,12.917 35.451,12.935 35.451,14.332 R37_CH2.1@35.47,14.351
NetU1_1: U1.1 U2.4 | length 3.6
  Top w0.1: U2.4@24.421,56.432 24.465,56.388 24.892,56.388 25.13,56.15 25.13,54.317 25.367,54.079 25.596,54.079 U1.1@25.871,53.804
NetU2_1: U2.1 U3.4 | length 5.1
  Top w0.127: U3.4@24.421,58.464 24.465,58.42 25.072,58.42 25.146,58.346 25.146,57.241 25.362,57.025 26.375,57.025 26.535,56.866 26.535,55.998 26.38,55.844 26.133,55.844 U2.1@25.871,55.582
OB_SPI_MISO: B1.22 U4.2 U6.1 U7.12 | length 45.6
  Top w0.127: B1.22@20.525,33.837 20.525,33.956 21.122,34.553 21.122,35.299 21.336,35.513 v1(21.336,35.56)
  Inner w0.127: v1(15.959,44.539) 15.959,43.022 16.297,42.684 16.297,42.449 19.092,39.654 19.092,37.804 v1(21.336,35.56) ; v1(29.083,36.873) 29.083,43.246 32.933,47.096 33.281,47.445 33.352,47.445 34.005,48.098 v1(34.005,48.133) 33.782,48.356 33.782,53.086 v1(33.401,53.467)
  Bottom w0.127: U4.2@12.573,45.626 13.673,45.626 14.76,44.539 v1(15.959,44.539) ; v1(21.336,35.56) 24.739,35.56 26.052,36.873 28.338,36.873 28.381,36.916 28.769,36.916 28.812,36.873 v1(29.083,36.873) ; 32.188,52.918 32.357,53.087 32.387,53.087 32.591,53.291 33.011,53.291 U7.12@33.223,53.503
OB_SPI_MOSI: B1.23 D2.2 U4.3 U6.14 U7.13 | length 60.5
  Top w0.127: B1.23@20.879,33.483 20.879,33.553 22.049,34.722 22.049,36.371 v1(21.59,36.83)
  Inner w0.127: v1(13.208,48.006) 13.208,49.429 13.462,49.683 13.462,52.034 15.035,53.607 20.471,53.607 21.979,55.114 25.322,55.114 25.329,55.122 26.393,55.122 26.603,55.331 26.991,55.331 27.264,55.058 27.264,55.051 28.046,54.27 29.51,54.27 30.343,55.103 32.823,55.103 33.223,54.703 v1(33.223,54.303) 32.755,53.836 32.755,48.376 v1(32.512,48.133) ; v1(14.89,48.24) 15.228,47.902 v1(19.431,47.902) 19.431,47.855 19.853,47.434 19.853,47.304 19.939,47.218 19.939,41.818 20.387,41.37 20.387,38.007 21.015,37.379 21.041,37.379 v1(21.59,36.83)
  Bottom w0.1: D2.2@31.238,53.264 31.997,53.264 32.272,53.538 32.272,53.753 32.597,54.078 32.998,54.078 v1(33.223,54.303)
  Bottom w0.127: U4.3@12.573,47.626 13.673,47.626 14.221,48.174 14.777,48.174 14.843,48.24 v1(14.89,48.24) ; v1(32.512,48.133) 33.102,48.133 33.757,47.477 U6.14@33.872,47.477
OB_SPI_SCK: B1.21 U4.4 U6.13 U7.14 | length 54.3
  Top w0.152: v1(13.843,49.403) 13.843,48.323 13.942,48.224 13.942,47.145 v1(15.113,45.974) ; v1(17.018,36.322) 17.252,36.556 18.974,36.556 19.308,36.89 19.717,36.89 20.722,35.885 20.722,34.845 20.172,34.295 B1.21@20.172,34.19 ; v1(33.475,46.977) 33.475,48.282 34.77,49.577 34.77,53.749 v1(34.29,54.229)
  Inner w0.152: v1(13.843,49.403) 18.078,49.403 19.939,51.264 19.939,51.987 21.772,53.82 23.225,53.82 23.733,53.312 23.948,53.312 26.063,51.197 26.063,50.982 29.226,47.819 v1(31.572,47.819) ; v1(15.113,45.974) 15.113,42.208 14.76,41.855 14.76,40.841 15.593,40.008 15.593,37.576 16.819,36.35 16.99,36.35 v1(17.018,36.322)
  Bottom w0.152: v1(31.572,47.819) 32.414,46.977 v1(33.475,46.977) U6.13@33.872,46.977
OFB_I2C_SCL: B1.28 J4.12 R5.1 | length 7.6
  Top w0.1: J4.12@22.098,26.664 22.098,27.309 21.768,27.639 21.63,27.639 20.164,29.105 20.164,29.551 R5.1@19.939,29.776 20.625,29.776 21.656,30.807 21.738,30.807 B1.28@22.647,31.716
OFB_I2C_SDA: B1.20 J4.11 R12.1 | length 14.7
  Top w0.127: B1.20@19.818,34.544 19.818,34.486 19.05,33.717 19.05,33.02 19.136,32.934 19.136,32.108 18.511,31.483 18.511,29.85 18.586,29.776 R12.1@19.05,29.776 19.05,27.934 18.914,27.798 18.914,25.53 19.642,24.803 21.054,24.803 22.098,23.759 J4.11@22.098,23.114
OFB_MISO: B1.10 J4.5 | length 20.1
  Top w0.1: B1.10@20.879,40.537 21.519,39.897 21.602,39.897 21.656,39.951 22.032,39.951 22.298,39.685 22.298,39.678 v1(22.606,39.37) 23.114,38.862 23.114,38.361 23.041,38.288 23.041,35.987 23.187,35.841 23.187,33.074 24.765,31.496 24.765,30.994 24.938,30.82 24.938,30.613 24.765,30.44 24.765,28.778 25.268,28.275 25.268,24.88 25.908,24.24 J4.5@25.908,23.114
  Bottom w0.1: v1(22.606,39.37) v1@22.644,39.332
OFB_MOSI: B1.11 J4.3 U1.4 | length 36.3
  Top w0.1: B1.11@20.525,40.184 21.223,39.486 21.223,39.485 21.235,39.497 v1(21.844,39.497) ; v1(22.733,50.292) 22.733,53.195 23.917,54.379 24.146,54.379 U1.4@24.421,54.654 ; v1(23.622,37.846) 23.622,36.377 23.495,36.25 23.495,34.834 25.146,33.183 25.146,30.868 25.727,30.287 25.727,29.022 25.508,28.803 25.508,28.721 v1(25.908,28.321)
  Inner w0.1: v1(22.733,50.292) 22.733,41.91 21.882,41.059 21.882,39.339 22.044,39.177 22.044,39.163 23.361,37.846 v1(23.622,37.846) ; v1(25.908,28.321) 25.908,25.019 v1(27.178,23.749)
OFB_NSS: B1.33 J4.6 | length 4.2
  Top w0.127: J4.6@25.908,26.664 25.908,26.977 26.225,27.293 26.531,27.293 26.531,29.96 B1.33@26.872,30.301
OFB_RX: B1.25 J4.14 | length 6.1
  Top w0.127: v1(20.574,31.75) 20.574,31.757 21.586,32.769 B1.25@21.586,32.776
  Inner w0.127: v1(20.574,31.75) 20.574,27.432 v1(20.828,27.178)
OFB_SCK: B1.34 J4.4 | length 4.5
  Top w0.127: J4.4@27.178,26.664 27.178,27.309 27.735,27.866 27.735,27.872 27.763,27.9 27.763,29.995 27.226,30.533 B1.34@27.226,30.655
OFB_TX: B1.24 J4.13 | length 10.2
  Top w0.1: v1(19.832,31.75) 21.212,33.13 B1.24@21.232,33.13
  Inner w0.1: v1(19.832,31.75) 20.139,31.443 20.139,27.225 20.701,26.663 v1(20.701,23.876)
OUT_CH1: C36_CH1.2 C37_CH1.2 J3.7 R34_CH1.1 R35_CH1.2 R36_CH1.2 U11_CH1.1 | length 30.4
  Top w0.154: v1(27.94,17.018) 28.276,17.018 28.648,17.39 29.292,18.034 29.916,18.034 30.186,18.304 J3.7@30.186,19.304
  Inner w0.154: v1(15.621,13.081) 15.649,13.109 15.649,13.381 18.62,16.352 22.45,16.352 22.549,16.253 27.175,16.253 v1(27.94,17.018)
  Bottom w0.154: C36_CH1.2@14.847,12.167 C36_CH1.2@14.847,12.193 ; C36_CH1.2@14.847,12.193 14.859,12.205 15.593,12.939 15.593,13.053 v1(15.621,13.081) 15.649,13.053 15.649,12.939 16.383,12.205 C37_CH1.2@16.383,12.18 C36_CH1.2@14.859,12.18 C36_CH1.2@14.847,12.193
  Bottom w0.254: C36_CH1.2@14.847,12.193 14.809,12.155 R36_CH1.2@13.589,12.155 ; R36_CH1.2@13.589,12.155 13.589,12.18 13.933,12.524 U11_CH1.1@13.933,14.336 13.676,14.336 13.657,14.317 13.657,14.235 13.138,13.716 R35_CH1.2@12.282,13.716 R34_CH1.1@12.282,12.446 12.573,12.155 R36_CH1.2@13.589,12.155
  Bottom w0.508: R34_CH1.1@12.282,12.446 R34_CH1.1@12.306,12.446 ; C36_CH1.2@14.859,12.18 C36_CH1.2@14.859,12.205
  Bottom w0.76: R36_CH1.2@13.519,12.225 R36_CH1.2@13.589,12.155 ; C36_CH1.2@14.847,12.167 C36_CH1.2@14.859,12.18
OUT_CH2: C36_CH2.2 C37_CH2.2 J3.5 R34_CH2.1 R35_CH2.2 R36_CH2.2 U11_CH2.1 | length 22.5
  Top w0.154: J3.5@25.186,19.304 26.193,18.297 26.193,17.922 26.193,17.858 27.266,16.649 ccw(c27.813,17.134) 27.331,16.584 28.43,15.621 28.494,15.621 33.909,15.621 v1(34.544,16.256)
  Bottom w0.154: C37_CH2.2@34.157,17.024 34.544,16.637 v1(34.544,16.256) 34.94,16.652 35.284,16.652 R34_CH2.1@35.515,16.883
  Bottom w0.508: 33.401,17.024 33.184,16.807 U11_CH2.1@33.184,15.001 33.225,15.001 33.845,15.621 R35_CH2.2@35.47,15.621 ; R35_CH2.2@35.515,15.621 35.515,16.883 R34_CH2.1@35.56,16.928 35.623,16.865 36.893,16.865 R36_CH2.2@36.957,16.928
  Bottom w0.76: C36_CH2.2@32.639,17.018 32.645,17.024 33.401,17.024 34.157,17.024 C37_CH2.2@34.163,17.03
P_E\N\: J3.4 R23.2 U10.2 | length 5.1
  Top w0.154: J3.4@22.686,19.304 22.686,18.784 23.309,18.161 v1(24.003,18.161)
  Bottom w0.152: U10.2@22.827,16.227 23.351,16.227 24.269,17.145 R23.2@24.294,17.145
  Bottom w0.154: v1(24.003,18.161) 24.003,17.436 R23.2@24.294,17.145
P_EN: J3.3 R22.2 U10.1 | length 5.7
  Top w0.154: J3.3@20.186,19.304 J3.3@20.186,19.038 ; J3.3@20.428,18.415 20.186,18.657 J3.3@20.186,19.038 ; v1(21.336,18.415) 20.809,18.415 J3.3@20.186,19.038
  Bottom w0.152: U10.1@22.827,16.702 22.987,16.862 22.987,17.69 22.86,17.817 R22.2@22.987,17.944
  Bottom w0.154: v1(21.336,18.415) 21.375,18.415 21.449,18.342 22.614,18.342 22.987,17.969 R22.2@22.987,17.944
PG: R24.1 U10.3 | length 1.5
  Bottom w0.152: U10.3@22.827,15.777 22.856,15.748 R24.1@24.294,15.748
PG_TH: R25.1 R30.2 U10.4 | length 2.9
  Bottom w0.152: U10.4@22.827,15.302 22.827,14.347 22.987,14.187 R25.1@22.987,13.933 23.851,13.933 24.269,14.351 R30.2@24.294,14.351
RD_ANT: J6.1 U4.9 | length 9.4
  Bottom w0.154: U4.9@28.573,57.626 31.119,57.626 ccw(c31.119,60.166) 33.659,60.166 J6.1@33.659,63.005
RD_BUSY: B1.52 U4.16 | length 6.5
  Top w0.254: B1.52@31.115,39.477 31.115,39.487 31.877,40.249 v1(31.877,40.259)
  Bottom w0.254: U4.16@28.573,43.626 28.447,43.5 28.453,43.494 28.453,42.794 31.011,40.236 31.842,40.236 31.865,40.259 v1(31.877,40.259)
RD_DIO1: B1.53 U4.15 | length 7.9
  Top w0.127: B1.53@30.761,39.83 31.463,40.532 31.463,40.734 v1(31.496,40.767)
  Top w0.254: v1(31.496,40.767) v1@31.505,40.776
  Bottom w0.254: U4.15@28.573,45.626 29.55,45.626 30.305,44.871 30.305,44.305 30.608,44.002 30.608,41.655 v1(31.496,40.767)
RD_NSS: B1.2 U4.5 | length 17.9
  Top w0.127: B1.2@23.707,43.366 23.707,43.357 24.386,42.678 v1(24.386,42.67)
  Inner w0.127: v1(13.97,51.816) v1(17.399,51.816)
  Bottom w0.127: v1(17.399,51.816) 17.415,51.8 18.939,51.8 19.091,51.648 20.107,51.648 23.495,48.26 23.495,43.561 v1(24.386,42.67)
RD_RESET: B1.26 U4.6 | length 27.3
  Top w0.127: v1(21.59,38.989) 21.623,38.956 21.755,38.956 22.565,38.145 22.565,36.525 22.266,36.225 22.266,34.604 22.477,34.393 22.477,33.083 21.94,32.545 B1.26@21.94,32.423
  Bottom w0.127: U4.6@12.573,53.626 14.694,53.626 20.354,47.965 20.514,47.965 20.996,47.484 20.996,44.002 21.302,43.696 21.302,43.24 21.549,42.993 21.549,41.235 21.377,41.062 21.377,39.249 21.59,39.036 v1(21.59,38.989)
SWCLK: B1.49 J1.4 | length 6.5
  Top w0.154: B1.49@32.176,38.416 32.174,38.414 32.174,38.311 32.639,37.846 v1(32.639,36.449) 32.611,36.421 32.611,35.996 33.498,35.109 33.498,34.563 33.921,34.14 J1.4@35.421,34.14
SWDIO: B1.46 J1.3 | length 5.3
  Top w0.154: B1.46@31.469,34.898 31.486,34.898 32.663,33.72 32.663,33.397 33.921,32.14 J1.3@35.421,32.14
SWO: B1.55 J1.5 | length 8.6
  Top w0.154: B1.55@30.054,40.537 30.157,40.537 30.637,41.017 30.868,41.248 31.695,41.248 32.866,40.077 32.866,39.27 35.101,37.035 35.101,36.459 J1.5@35.421,36.14
USB_Data_N: B1.45 J2.A7 J2.B7 | length 26.2
  Top w0.127: v1(30.48,37.846) 30.447,37.813 30.325,37.813 29.886,37.374 29.886,36.636 29.893,36.629 29.893,35.682 31.031,34.544 B1.45@31.115,34.544 ; J2.B7@30.524,50.771 J2.B7@30.61,50.685 31.331,50.685 32.225,49.791 32.225,49.69 v1(32.258,49.657) ; J2.A7@30.61,51.685 31.78,51.685 32.892,50.573 32.892,50.512 33.245,50.159 33.245,47.666 33.008,47.429 33.008,46.784 33.487,46.304 33.487,44.277 33.317,44.107 33.317,42.93 33.401,42.846 v1(33.401,42.799)
  Inner w0.127: v1(30.48,37.846) 30.513,37.879 30.666,37.879 31.029,38.241 31.029,40.961 31.634,41.566 32.131,41.566 32.196,41.631 32.577,41.631 33.295,42.349 33.295,42.646 33.401,42.752 v1(33.401,42.799) ; v1(32.131,51.562) 32.131,51.515 32.258,51.388 v1(32.258,49.657)
USB_Data_P: B1.44 J2.A6 J2.B6 | length 23.9
  Top w0.127: v1(30.088,38.238) 30.055,38.205 30.055,38.082 29.55,37.578 29.55,35.486 30.761,34.275 B1.44@30.761,34.19 ; J2.A6@30.61,51.185 30.669,51.244 31.648,51.244 31.648,51.156 32.561,50.243 32.623,50.243 32.864,50.001 32.864,48.442 32.979,48.327 32.979,47.939 32.627,47.586 32.627,46.626 33.106,46.146 33.106,44.435 32.936,44.264 32.936,42.98 32.849,42.894 v1(32.849,42.847) ; J2.B6@30.61,52.185 30.616,52.191 31.617,52.191 v1(31.623,52.197)
  Inner w0.127: v1(30.088,38.238) 30.135,38.238 30.222,38.325 30.573,38.325 30.648,38.399 30.648,41.118 31.476,41.947 31.974,41.947 32.038,42.012 32.419,42.012 32.914,42.507 32.914,42.671 32.882,42.703 32.882,42.814 v1(32.849,42.847) ; v1(31.623,51.181) v1(31.623,52.197)
USB_VBUS: D5.1 J2.A4-B9 J2.B4-A9 | length 15.6
  Top w0.1: D5.1@28.067,49.035 J2.A4-B9@30.61,49.035
  Top w0.127: v1(26.67,49.022) 28.054,49.022 D5.1@28.067,49.035 ; v1(26.797,54.864) 27.137,55.204 29.505,55.204 29.76,54.95 29.76,54.237 29.926,54.071 30.374,54.071 J2.B4-A9@30.61,53.835 J2.B4-A9@30.846,53.599
  Bottom w0.127: v1(26.67,49.022) 26.076,49.616 26.076,53.45 26.797,54.171 v1(26.797,54.864)
VBAT: B2.3 C20.2 C30.2 C31.2 C32.2 F1.2 J4.8 J4.9 Q3.2 R25.2 R34_CH1.2 R34_CH2.2 U10.5 | length 78
  Top w0.127: v1(15.18,21.523) 15.18,25.458 Q3.2@15.433,25.711 ; J4.9@23.368,23.114 23.368,23.759 23.685,24.076 23.822,24.076 v1(24.765,25.019) 24.765,25.066 24.635,25.196 24.635,26.661 J4.8@24.638,26.664
  Inner w0.127: v1(10.832,12.446) 10.879,12.446 10.954,12.521 10.985,12.521 17.584,19.119 ; v1(15.18,21.523) 17.584,19.119 ; v1(23.368,22.479) 27.222,18.625 v1(28.861,18.625) 27.848,17.612 21.608,17.612 v1(21.582,17.587) 19.118,17.587 17.586,19.119 17.584,19.119 ; v1@35.548,18.378 v1(35.56,18.378)
  Inner w0.254: v1(31.496,18.415) 32.396,18.415 32.65,18.161 35.331,18.161 v1@35.548,18.378 ; v1(35.56,18.378) 34.306,19.632 34.306,33.206 36.195,35.095 v1(36.195,37.465)
  Bottom w0.127: v1(21.582,17.587) 21.96,17.587 22.352,17.195 U10.5@22.352,16.002
  Bottom w0.203: U10.5@22.352,16.002 22.352,14.65 22.12,14.417 22.12,13.957 22.113,13.95 22.113,13.382 22.987,12.508 R25.2@22.987,12.483 R25.2@22.987,12.446
  Bottom w0.254: B2.3@26.102,25.033 26.102,26.22 C20.2@26.806,26.924 ; F1.2@36.068,38.794 36.195,38.667 v1(36.195,37.465)
  Bottom w0.76: R34_CH1.2@10.737,12.376 10.807,12.446 v1(10.832,12.446) ; C30.2@28.829,18.657 v1(28.861,18.625) 28.892,18.593 30.035,18.593 30.099,18.53 30.162,18.466 31.305,18.466 C32.2@31.369,18.403
VDDA: B1.13 C1.2 C2.2 FB1.1 | length 4
  Top w0.254: FB1.1@16.764,41.685 16.764,41.664 16.973,41.455 17.11,41.455 17.473,41.091 C1.2@17.723,41.091 C2.2@18.358,40.456 18.372,40.47 18.631,40.47 18.99,40.111 19.152,40.111 19.786,39.477 B1.13@19.818,39.477
pads on no net: B1.38 B1.50 B1.57 J1.1 J1.2 J1.7 J1.8 J2.1 J2.2 J2.3 J2.4 J2.A8 J2.B8 J2.M1 J2.M2 J3.SH1 J3.SH2 LS1.3 MD1.13 MD1.15 MD1.16 MD1.17 U3.1 U4.7 U4.11 U4.12 U4.14 U6.2 U6.3 U6.4 U6.9 U6.10 U6.11 U7.8 U7.9 U7.10 U9.6 U10.7 U10.10 U11_CH1.2 U11_CH1.3 U11_CH2.2 U11_CH2.3 U12.4

## Polygon pours and split planes (outlines as drawn)
GND on Bottom "GND_L06_P004" (solid, pour order 4): 37.719,59.611 37.719,55.621 31.081,55.164 26.797,55.363 26.797,58.928
GND on Bottom "GND_L06_P003" (solid, pour order 3): 37.719,65.151 37.719,59.182 29.337,58.928 29.464,65.397
GND on Top "GND_L01_P001" (solid, pour order 1): 10.16,65 10.287,57.404 19.783,57.404 20.037,65
GND on Top "GND_L01_P002" (solid, pour order 2): 19.812,65 19.836,65.024 22.987,65.024 22.987,60.579 19.431,60.579
3V3 on Power "3V3_L04_P009" (solid, pour order 9): 6.731,68.707 41.148,68.707 41.148,7.112 5.588,7.112
GND on GND-B (split plane): 313 vertices, not listed, extent 10.51,10.51 37.49,64.49
GND on GND-T (split plane): 313 vertices, not listed, extent 10.51,10.51 37.49,64.49

## Keep-outs
Keep-Out Layer:
  circle w3: c11.6,23.5 r1.5
  circle w3: c36.4,23.5 r1.5
  circle w3: c26.364,62 r1.5

## Other copper
Top:
  pour cut-out: 19.82,65.143 19.918,65.078 19.983,64.98 20.006,64.865 20.006,61.265 19.983,61.15 19.918,61.052 19.82,60.987 19.705,60.964 19.388,60.964 19.247,60.499 19.233,60.473 19.225,60.445 18.982,59.99 18.963,59.967 18.949,59.941 18.622,59.543 18.599,59.524 18.58,59.501 18.182,59.174 18.156,59.16 18.133,59.141 17.678,58.898 17.65,58.89 17.624,58.876 17.13,58.726 17.101,58.723 17.073,58.714 16.559,58.664 16.545,58.665 16.53,58.662 16.498,58.669 12.757,58.669 12.757,58.603 12.734,58.488 12.669,58.39 12.571,58.325 12.456,58.302 10.856,58.302 10.741,58.325 10.643,58.39 10.578,58.488 10.555,58.603 10.555,59.503 10.578,59.618 10.643,59.716 10.741,59.781 10.856,59.804 12.456,59.804 12.571,59.781 12.669,59.716 12.734,59.618 12.757,59.503 12.757,59.437 16.53,59.437 16.544,59.434 16.951,59.475 17.357,59.598 17.73,59.797 18.057,60.066 18.326,60.393 18.525,60.766 18.585,60.964 18.435,60.964 18.32,60.987 18.222,61.052 18.157,61.15 18.134,61.265 18.134,64.865 18.157,64.98 18.222,65.078 18.32,65.143 18.435,65.166 19.705,65.166

## Silkscreen, mask and mechanical layers (free items; w line width, h text height)
Board Outline:
  the board outline again, w0.01

## Text inside footprints (layer, text, board x,y; h text height)
J5: Top Assembly "PCB EDGE" at 21.002,66.196 h0.5 r180
J6: Bottom Assembly "PCB EDGE" at 31.727,66.136 h0.5 r180
U6: Bottom 3D Body "*" at 34.421,48.209 h1.27 r90; Bottom Overlay "*" at 34.421,49.327 h1.27 r90